# Altium PCB Grantv3.PcbDoc (part 2 of 5)
Units mil, origin at the board's own origin, x right, y up, seen from the top; angles counter-clockwise.
Board outline 3031.03 x 2829.03 mil, 2 copper layers (Top Layer, Bottom Layer); 187 components, 111 nets, 634 pads, 178 vias.
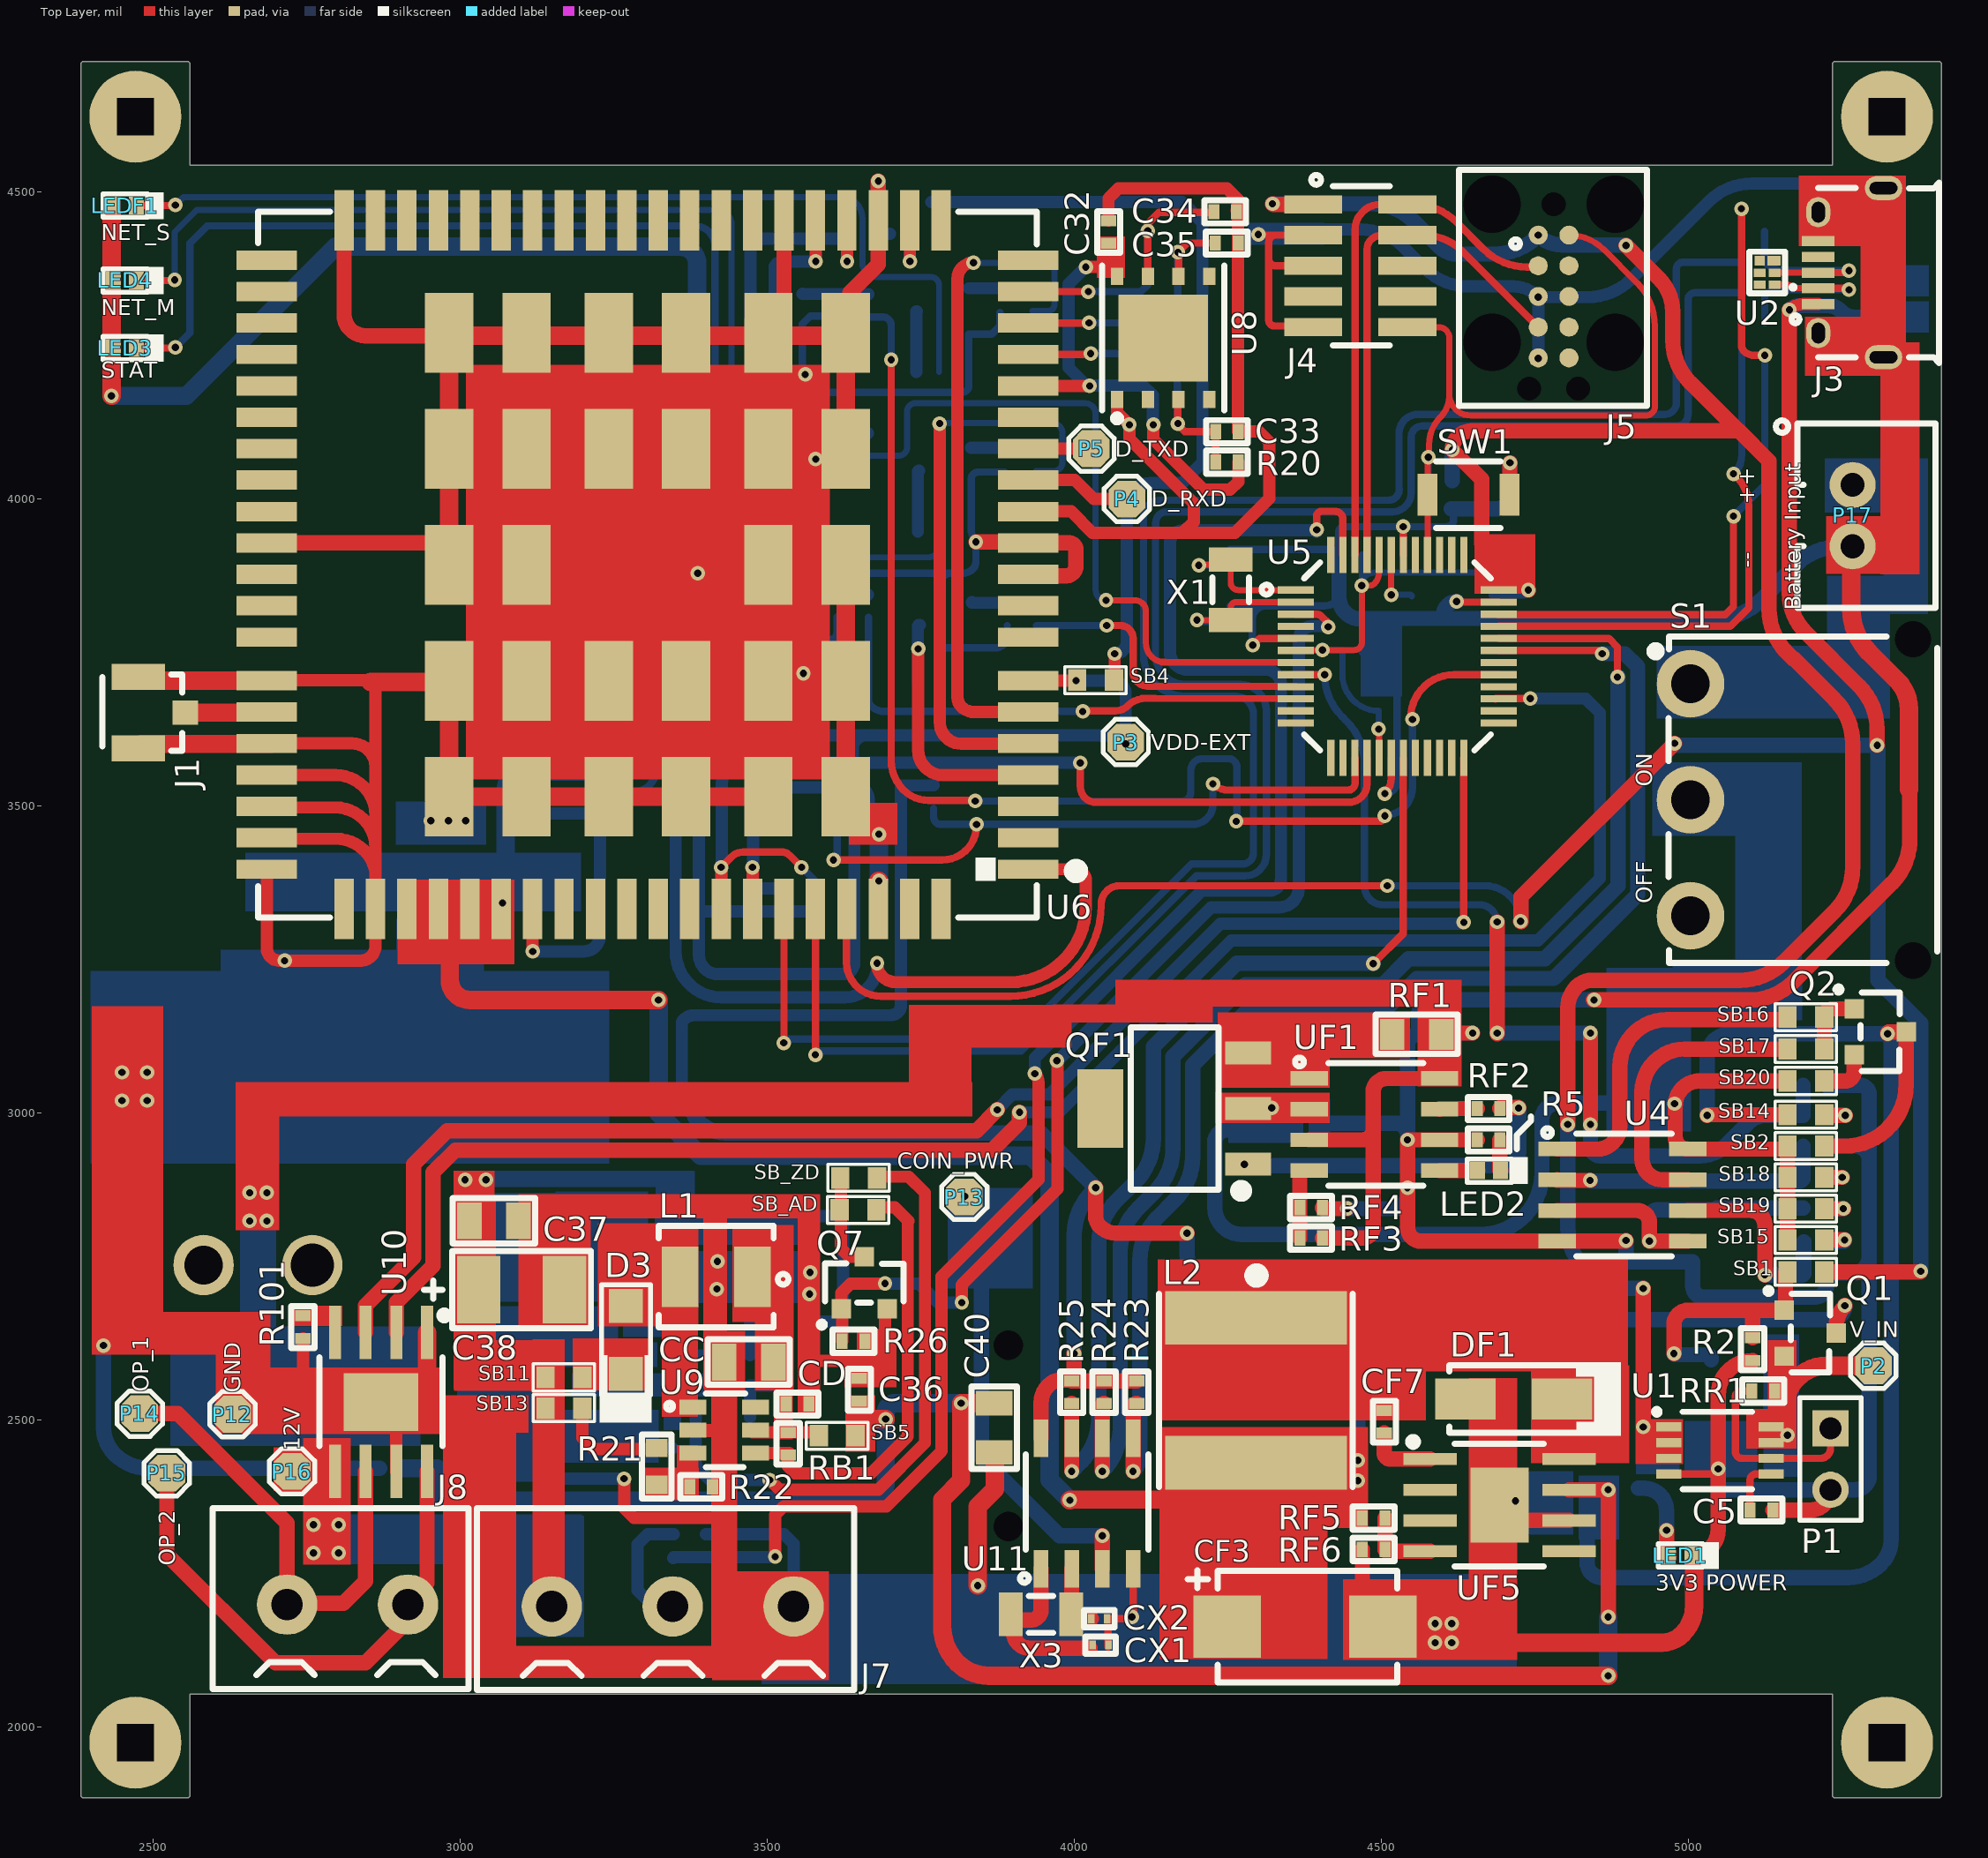
[diagram p0: Top Layer view]

## Part data (continued)
J5: "CBL PLUG-OF-NAILS 10-PIN W/LEGS", MANUFACTURER=Tag-Connect, Package Quantity=1, Supplier Part Number 1=TC2050-IDC-ND, ComponentLink1Description=http://www.tag-connect.com/Materials/TC2050-IDC%20Datasheet.pdf?src-supplier=Digi-Key, ComponentLink1URL=http://www.tag-connect.com/Materials/TC2050-IDC%20Datasheet.pdf?src-supplier=Digi-Key, Manufacturer Part Number=TC2050-IDC, Pricing 1="1=40.17 (USD)", Stock 1=59, Supplier 1=Digi-Key
J6: "SMD Battery Holders, Clips & Contacts RoHS", MANUFACTURER=Q&J, Package=Cuctom, Manufacturer Part No=CR1220-2
J7 J8: "P=5.0mm Screw terminal RoHS", MANUFACTURER="Ningbo Kangnex Elec", Package=Custom
  J7: Manufacturer Part No=WJ301V-5.0-3P
  J8: Manufacturer Part No=WJ301V-5.0-2P
L1 LZ: "10uH ±20% 1.6A 230mO SMD,4.75x4.2x2mm Inductors (SMD) RoHS", MANUFACTURER=COILMX, Package=Custom, Manufacturer Part No=MS0420-100M
L2: "15uH ±20% 2.5A 56mO SMD,8.0x8.0mm Inductors (SMD) RoHS", MANUFACTURER="3L COILS", Package=Custom, Manufacturer Part No=SNR8040K-150M
LED1 LED2: "Red 625nm 0402 Light Emitting Diodes (LED) RoHS", MANUFACTURER=TOGIALED, Package=0402, Manufacturer Part No=TJ-S1005SW4TGLC2R-A5
LED3: "Blue 465nm 0402 Light Emitting Diodes (LED) RoHS", MANUFACTURER=TOGIALED, Package=0402, Manufacturer Part No=TJ-S1005SW4TGLC6B-A5
LED4 LEDF1: "Green 573nm 0402 Light Emitting Diodes (LED) RoHS", MANUFACTURER=TOGIALED, Package=0402, Manufacturer Part No=TJ-S1005SW4TGLC7K-A5
P1: library part "Header 1x2", "CONN HEADER VERT 2POS 2.54MM", Color=Black, Current Rating=3A, MANUFACTURER="Wurth Electronics", Max Operating Temperature=125°C, Min Operating Temperature=-40°C, Supplier Part Number 1=732-5315-ND, Voltage Rating=250V, ComponentLink1Description=http://www.mouser.com/ds/2/445/6130xx11121-538006.pdf?src-supplier=Mouser, ComponentLink1URL=http://www.mouser.com/ds/2/445/6130xx11121-538006.pdf?src-supplier=Mouser, Connector Type="Male Pin", Contact Gender=Male, Contact Material="Copper Alloy,Copper", Contact Mating Length=0.236inch, Contact Plating=Gold, Gender=Male, Housing Material=PBT, Lead Free="Lead Free", Manufacturer Part Number=61300211121, Mount="Through Hole", Number of Contacts=2, Number of Positions=2, Number of Rows=1, Packaging=Bulk, Pitch=0.1inch, Pricing 1="1=0.13, 10=0.106, 25=0.088, 50=0.074, 100=0.067, 1000=0.061 (USD)", REACH SVHC=Unknown, Stock 1=219205, Supplier 1=Digi-Key, Termination="Through Hole"
P2: "Test Point ON"
P3 P4 P5 P12 P13 P14 P15 P16: library part "TEST POINT", "Test Point ON"
P17: library part "2 Pin JST Connector", "2 PIN JST Connector"
Q1: "MOSFET P-CHAN 24V SOT23", Case/Package=SOT-23, Continuous Drain Current (ID)=4.3A, Drain to Source Voltage (Vdss)=20V, Input Capacitance=634pF, MANUFACTURER=Diodes, Max Operating Temperature=150°C, Max Power Dissipation=800mW, Min Operating Temperature=-55°C, Supplier Part Number 1=DMP2045U-7DICT-ND, ComponentLink1Description=https://www.diodes.com/assets/Datasheets/DMP2045U.pdf?src-supplier=Digi-Key, ComponentLink1URL=https://www.diodes.com/assets/Datasheets/DMP2045U.pdf?src-supplier=Digi-Key, Manufacturer Part Number=DMP2045U-7, Mount="Surface Mount", Packaging="Tape and Reel", Pricing 1="1=0.43, 10=0.323, 25=0.2828, 100=0.1535, 250=0.15272, 500=0.12524, 1000=0.09292 (USD)", Rds On Max=45mR, Stock 1=21481, Supplier 1=Digi-Key
Q2: "MOSFET P-CH 20V 2.8A SOT-23", MANUFACTURER=Nexperia, Supplier Part Number 1=1727-3124-1-ND, Manufacturer Part Number=PMV65XP,215, Pricing 1="1=0.38, 10=0.28, 25=0.2452, 100=0.133, 250=0.13232, 500=0.1085, 1000=0.0805 (USD)", Stock 1=60287, Supplier 1=Digi-Key
Q4 Q5 Q6 QF3 QF4 QF7: "MOSFET N-CH 50V 200MA SOT-23", Case/Package=SOT-23-3, Continuous Drain Current (ID)=200mA, Drain to Source Breakdown Voltage=50V, Drain to Source Resistance=3.5R, Gate to Source Voltage (Vgs)=20V, Input Capacitance=50pF, MANUFACTURER="ON Semiconductor", Max Operating Temperature=150°C, Max Power Dissipation=225mW, Min Operating Temperature=-55°C, Package Quantity=1, Supplier Part Number 1=BSS138LT1GOSDKR-ND, Threshold Voltage=1.5V, ComponentLink1Description=https://datasheet.ciiva.com/22641/1596366-22641636.pdf, ComponentLink1URL=https://datasheet.ciiva.com/22641/1596366-22641636.pdf, ComponentLink2Description=https://datasheet.ciiva.com/1190/1596366-1190137.pdf, ComponentLink2URL=https://datasheet.ciiva.com/1190/1596366-1190137.pdf, ComponentLink3Description=https://datasheet.ciiva.com/15198/getdatasheetpartid-110266-15198908.pdf, ComponentLink3URL=https://datasheet.ciiva.com/15198/getdatasheetpartid-110266-15198908.pdf, ComponentLink4Description=https://datasheet.ciiva.com/8115/bss138lt1-d-8115295.pdf, ComponentLink4URL=https://datasheet.ciiva.com/8115/bss138lt1-d-8115295.pdf, ComponentLink5Description=https://datasheet.ciiva.com/8115/bss138lt1-d-8115358.pdf, ComponentLink5URL=https://datasheet.ciiva.com/8115/bss138lt1-d-8115358.pdf, ComponentLink6Description=https://datasheet.ciiva.com/1190/1596366-1190136.pdf, ComponentLink6URL=https://datasheet.ciiva.com/1190/1596366-1190136.pdf, ComponentLink7Description=https://datasheet.ciiva.com/936/bss138lt1-d-936802.pdf, ComponentLink7URL=https://datasheet.ciiva.com/936/bss138lt1-d-936802.pdf, ComponentLink8Description=https://datasheet.ciiva.com/936/bss138lt1-d-936801.pdf, ComponentLink8URL=https://datasheet.ciiva.com/936/bss138lt1-d-936801.pdf, ComponentLink9Description=https://datasheet.ciiva.com/14553/70099493-14553829.pdf, ComponentLink9URL=https://datasheet.ciiva.com/14553/70099493-14553829.pdf, ComponentLink10Description=https://datasheet.ciiva.com/936/bss138lt1-d-936803.pdf, ComponentLink10URL=https://datasheet.ciiva.com/936/bss138lt1-d-936803.pdf, ComponentLink11Description=http://www.onsemi.com/pub/Collateral/BSS138LT1-D.PDF?src-supplier=Digi-Key, ComponentLink11URL=http://www.onsemi.com/pub/Collateral/BSS138LT1-D.PDF?src-supplier=Digi-Key, ComponentLink12Description=http://www.farnell.com/datasheets/1596366.pdf?src-supplier=Element14, ComponentLink12URL=http://www.farnell.com/datasheets/1596366.pdf?src-supplier=Element14, ComponentLink13Description=http://www.alliedelec.com/m/d/b3c6fd7d92596813fe75d33dcbaaae90.pdf?src-supplier=Allied+Electronics, ComponentLink13URL=http://www.alliedelec.com/m/d/b3c6fd7d92596813fe75d33dcbaaae90.pdf?src-supplier=Allied+Electronics, ComponentLink14Description=https://www.verical.com/server-webapp/html/getDatasheet?partID=110266&src-supplier=Verical, ComponentLink14URL=https://www.verical.com/server-webapp/html/getDatasheet?partID=110266&src-supplier=Verical, ComponentLink15Description=http://www.onsemi.com/pub_link/Collateral/BSS138LT1-D.PDF?src-supplier=Avnet, ComponentLink15URL=http://www.onsemi.com/pub_link/Collateral/BSS138LT1-D.PDF?src-supplier=Avnet, Contact Plating=Tin,Matte, Current Rating=200mA, Element Configuration=Single, Halogen Free="Halogen Free", Height=1.01mm, Lead Free="Lead Free", Length=3.04mm, Manufacturer Part Number=BSS138LT1G, Nominal Vgs=1.5V, Number of Elements=1, Number of Pins=3, On-State Resistance=3.5R, Packaging="Tape and Reel", Power Dissipation=225mW, Pricing 1="1=0.27, 10=0.222, 100=0.1177, 500=0.07746, 1000=0.05267 (USD)", Radiation Hardening=No, Rds On Max=3.5R, REACH SVHC="No SVHC", Stock 1=1283212, Supplier 1=Digi-Key, Turn-Off Delay Time=20ns, Turn-On Delay Time=20ns, Voltage Rating (DC)=50V, Width=1.4mm
Q7: "MOSFET N-CH 100V .1A SOT23-3", Case/Package=SOT-23, Continuous Drain Current (ID)=100mA, Drain to Source Breakdown Voltage=100V, Drain to Source Resistance=10R, Gate to Source Voltage (Vgs)=20V, Input Capacitance=40pF, MANUFACTURER="Diodes Zetex", Max Operating Temperature=150°C, Max Power Dissipation=330mW, Min Operating Temperature=-55°C, Package Quantity=3000, Supplier Part Number 1=ZVN3310FCT-ND, Threshold Voltage=2.4V, ComponentLink1Description=http://www.diodes.com/_files/datasheets/ZVN3310F.pdf?src-supplier=Digi-Key, ComponentLink1URL=http://www.diodes.com/_files/datasheets/ZVN3310F.pdf?src-supplier=Digi-Key, Current=100mA, Current Rating=100mA, Drain to Source Voltage (Vdss)=100V, Dual Supply Voltage=100V, Element Configuration=Single, Fall Time=5ns, Height=1.02mm, Lead Free="Lead Free", Length=3.04mm, Manufacturer Part Number=ZVN3310FTA, Mount="Surface Mount", Nominal Vgs=2.4V, Number of Channels=1, Number of Elements=1, Number of Pins=3, On-State Resistance=10R, Packaging="Tape and Reel", Power Dissipation=330mW, Pricing 1="1=0.59, 10=0.517, 25=0.4852, 100=0.3522, 250=0.33972, 500=0.29432, 1000=0.25048 (USD)", Radiation Hardening=No, Rds On Max=10R, REACH SVHC="No SVHC", Rise Time=5ns, Stock 1=16974, Supplier 1=Digi-Key, Termination=SMD/SMT, Turn-Off Delay Time=4ns, Turn-On Delay Time=3ns, Voltage=100V, Voltage Rating (DC)=100V, Weight=0.000282oz, Width=1.4mm
Q8: "MOSFET 2N-CH 60V 0.32A 6TSSOP", MANUFACTURER=Nexperia, Supplier Part Number 1=1727-6479-1-ND, ComponentLink1Description=http://www.farnell.com/datasheets/1443348.pdf?src-supplier=Farnell, ComponentLink1URL=http://www.farnell.com/datasheets/1443348.pdf?src-supplier=Farnell, ComponentLink2Description=https://assets.nexperia.com/documents/data-sheet/BSS138PS.pdf?src-supplier=Digi-Key, ComponentLink2URL=https://assets.nexperia.com/documents/data-sheet/BSS138PS.pdf?src-supplier=Digi-Key, ComponentLink3Description=http://www.farnell.com/datasheets/1443348.pdf?src-supplier=Newark, ComponentLink3URL=http://www.farnell.com/datasheets/1443348.pdf?src-supplier=Newark, Manufacturer Part Number=BSS138PS,115, Pricing 1="1=0.42, 10=0.31, 25=0.2716, 100=0.1474, 250=0.14668, 500=0.12028, 1000=0.08924 (USD)", Stock 1=143402, Supplier 1=Digi-Key
QF1: "TRANS PNP 60V 3A SOT223", Case/Package=SOT-223, Collector Base Voltage (VCBO)=-60V, Collector Emitter Breakdown Voltage=60V, Collector Emitter Saturation Voltage=500mV, Current Rating=-3A, Emitter Base Voltage (VEBO)=-5V, Frequency=75MHz, MANUFACTURER="ON Semiconductor / Fairchild", Max Collector Current=3A, Max Operating Temperature=150°C, Max Power Dissipation=2W, Min Operating Temperature=-55°C, Package Quantity=1, Supplier Part Number 1=NZT660ACT-ND, Collector Emitter Voltage (VCEO)=60V, ComponentLink1Description=http://www.mouser.com/ds/2/149/NZT660A-191298.pdf?src-supplier=Mouser, ComponentLink1URL=http://www.mouser.com/ds/2/149/NZT660A-191298.pdf?src-supplier=Mouser, ComponentLink2Description=http://www.fairchildsemi.com/datasheets/NZ/NZT660A.pdf?src-supplier=Digi-Key, ComponentLink2URL=http://www.fairchildsemi.com/datasheets/NZ/NZT660A.pdf?src-supplier=Digi-Key, ComponentLink3Description=https://www.fairchildsemi.com/package-drawings/MA/MA04A.pdf?src-supplier=Digi-Key, ComponentLink3URL=https://www.fairchildsemi.com/package-drawings/MA/MA04A.pdf?src-supplier=Digi-Key, ComponentLink4Description=https://www.fairchildsemi.com/datasheets/NZ/NZT660.pdf?src-supplier=Avnet, ComponentLink4URL=https://www.fairchildsemi.com/datasheets/NZ/NZT660.pdf?src-supplier=Avnet, ComponentLink5Description=http://www.fairchildsemi.com/ds/NZ/NZT660.pdf?src-supplier=Avnet, ComponentLink5URL=http://www.fairchildsemi.com/ds/NZ/NZT660.pdf?src-supplier=Avnet, ComponentLink6Description=http://www.farnell.com/datasheets/1794589.pdf?src-supplier=Element14, ComponentLink6URL=http://www.farnell.com/datasheets/1794589.pdf?src-supplier=Element14, ComponentLink7Description=http://www.fairchildsemi.com/ds/NZ/NZT660A.pdf?src-supplier=Future+Electronics, ComponentLink7URL=http://www.fairchildsemi.com/ds/NZ/NZT660A.pdf?src-supplier=Future+Electronics, Element Configuration=Single, Gain Bandwidth Product=75MHz, hFE Min=250, Lead Free="Lead Free", Manufacturer Part Number=NZT660A, Max Breakdown Voltage=60V, Mount="Surface Mount", Number of Elements=1, Number of Pins=4, Packaging="Tape and Reel", Polarity=PNP, Power Dissipation=2W, Pricing 1="1=0.48, 10=0.411, 25=0.3832, 100=0.2847, 250=0.27048, 500=0.22228, 1000=0.18068 (USD)", Radiation Hardening=No, REACH SVHC="No SVHC", Stock 1=9382, Supplier 1=Digi-Key, Transition Frequency=75MHz, Voltage Rating (DC)=-60V, Weight=0.188g
R1: library part RTT02471JTH, "470 ±5% 1/16W ±100ppm/°C 0402 Chip Resistor - Surface Mount RoHS", MANUFACTURER=RALEC, Package=0402, Manufacturer Part No=RTT02471JTH
R2: library part ERJPA2F1003X, "RES SMD 100K OHM 1% 1/5W 0402", Case/Package=0402, Case Code (Metric)=1005, MANUFACTURER=Panasonic, Manufacturer Part Number=ERJ-PA2F1003X, Max Operating Temperature=155°C, Max Power Dissipation=200mW, Min Operating Temperature=-55°C, Resistance=100kR, Supplier Part Number 1=P17236CT-ND, Temperature Coefficient=100ppm/°C, Tolerance=1%, Voltage Rating=50V, Case Code (Imperial)=0402, ComponentLink1Description=http://www.farnell.com/datasheets/2051174.pdf?src-supplier=Element14, ComponentLink1URL=http://www.farnell.com/datasheets/2051174.pdf?src-supplier=Element14, ComponentLink2Description=https://industrial.panasonic.com/ww/system/files/data/download/catalog/id_fixed-resistors_e_1.pdf?src-supplier=Digi-Key, ComponentLink2URL=https://industrial.panasonic.com/ww/system/files/data/download/catalog/id_fixed-resistors_e_1.pdf?src-supplier=Digi-Key, Composition="Thick Film", Features="Automotive AEC-Q200", Height=0.016inch, Length=0.039inch, Number of Terminations=2, Packaging="Cut Tape", Power Rating=200mW, Pricing 1="1=0.21, 10=0.175, 100=0.0686, 1000=0.02871, 2500=0.02632, 5000=0.02393 (USD)", REACH SVHC=Unknown, Stock 1=8829, Supplier 1=Digi-Key, Voltage Rating (DC)=50V, Width=0.02inch
R5: library part RC0402FR-072KL, "RES SMD 2K OHM 1% 1/16W 0402", Case/Package=0402, Case Code (Metric)=1005, MANUFACTURER=Yageo, Max Operating Temperature=155°C, Max Power Dissipation=63mW, Min Operating Temperature=-55°C, Package Quantity=1, Resistance=2kR, Supplier Part Number 1=311-2KLRCT-ND, Temperature Coefficient=100ppm/°C, Tolerance=1%, Voltage Rating=50V, Case Code (Imperial)=0402, ComponentLink1Description=http://www.yageo.com/documents/recent/PYu-RC_Group_51_RoHS_L_10.pdf?src-supplier=Digi-Key, ComponentLink1URL=http://www.yageo.com/documents/recent/PYu-RC_Group_51_RoHS_L_10.pdf?src-supplier=Digi-Key, ComponentLink2Description=http://documents.rs-components.com/techlib://itc_doclist_GB.htm?stockno=6186510&src-supplier=RSComponents, ComponentLink2URL=http://documents.rs-components.com/techlib://itc_doclist_GB.htm?stockno=6186510&src-supplier=RSComponents, ComponentLink3Description=https://www.verical.com/server-webapp/html/getDatasheet?partID=358921&src-supplier=Verical, ComponentLink3URL=https://www.verical.com/server-webapp/html/getDatasheet?partID=358921&src-supplier=Verical, ComponentLink4Description=http://www.mouser.com/ds/2/447/PYu-RC0402_51_RoHS_L_6_r-8721.pdf?src-supplier=Mouser, ComponentLink4URL=http://www.mouser.com/ds/2/447/PYu-RC0402_51_RoHS_L_6_r-8721.pdf?src-supplier=Mouser, ComponentLink5Description=http://www.farnell.com/datasheets/1018594.pdf?src-supplier=Element14, ComponentLink5URL=http://www.farnell.com/datasheets/1018594.pdf?src-supplier=Element14, ComponentLink6Description=http://www.farnell.com/datasheets/2167052.pdf?src-supplier=Element14, ComponentLink6URL=http://www.farnell.com/datasheets/2167052.pdf?src-supplier=Element14, Composition="Thick Film", Depth=0.5mm, Features="Moisture Resistant", Height=0.016inch, Lead Free="Lead Free", Length=1mm, Manufacturer Part Number=RC0402FR-072KL, Military Standard=Not, Number of Terminations=2, Packaging="Tape and Reel", Power Rating=63mW, Pricing 1="1=0.1, 10=0.016, 100=0.0064, 1000=0.00289, 2500=0.00251, 5000=0.00207 (USD)", REACH SVHC=Unknown, Stock 1=4877389, Supplier 1=Digi-Key, Termination=SMD/SMT, Voltage Rating (DC)=50V, Width=0.02inch, Working Voltage=50V
R6: library part AC0402FR-0780K6L, "RES SMD 80.6K OHM 1% 1/16W 0402", Case/Package=0402, MANUFACTURER=Yageo, Max Operating Temperature=155°C, Max Power Dissipation=63mW, Min Operating Temperature=-55°C, Resistance=80.6kR, Supplier Part Number 1=YAG5310CT-ND, Temperature Coefficient=100ppm/°C, Tolerance=1%, ComponentLink1Description=http://www.yageo.com/NewPortal/yageodocoutput?fileName=/pdf/R-Chip/PYu-AC_51_RoHS_L_5.pdf&src-supplier=Digi-Key, ComponentLink1URL=http://www.yageo.com/NewPortal/yageodocoutput?fileName=/pdf/R-Chip/PYu-AC_51_RoHS_L_5.pdf&src-supplier=Digi-Key, ComponentLink2Description=http://www.yageo.com/NewPortal/yageodocoutput?fileName=/pdf/R-Chip/PYu-AC_51_RoHS_L_6.pdf&src-supplier=Digi-Key, ComponentLink2URL=http://www.yageo.com/NewPortal/yageodocoutput?fileName=/pdf/R-Chip/PYu-AC_51_RoHS_L_6.pdf&src-supplier=Digi-Key, Composition="Thick Film", Features="Moisture Resistant,Automotive AEC-Q200", Height=0.015inch, Length=0.039inch, Manufacturer Part Number=AC0402FR-0780K6L, Number of Terminations=2, Packaging="Tape and Reel", Pricing 1="1=0.1, 10=0.021, 100=0.0087, 1000=0.0039, 2500=0.00338, 5000=0.00279 (USD)", Stock 1=34085, Supplier 1=Digi-Key, Width=0.02inch
R7: library part AC0402FR-0730K9L, "RES SMD 30.9K OHM 1% 1/16W 0402", Case/Package=0402, Case Code (Metric)=1005, MANUFACTURER=Yageo, Max Operating Temperature=155°C, Max Power Dissipation=63mW, Min Operating Temperature=-55°C, Power Rating=62.5mW, Resistance=30.9kR, Supplier Part Number 1=AC0402FR-0730K9L-ND, Temperature Coefficient=100ppm/°C, Tolerance=1%, Voltage Rating=50V, Case Code (Imperial)=0402, ComponentLink1Description=http://www.mouser.com/ds/2/447/yageodocoutput-1111992.pdf?src-supplier=Mouser, ComponentLink1URL=http://www.mouser.com/ds/2/447/yageodocoutput-1111992.pdf?src-supplier=Mouser, ComponentLink2Description=http://www.yageo.com/NewPortal/yageodocoutput?fileName=/pdf/R-Chip/PYu-AC_51_RoHS_L_6.pdf&src-supplier=Digi-Key, ComponentLink2URL=http://www.yageo.com/NewPortal/yageodocoutput?fileName=/pdf/R-Chip/PYu-AC_51_RoHS_L_6.pdf&src-supplier=Digi-Key, Composition="Thick Film", Features="Moisture Resistant,Automotive AEC-Q200", Height=0.015inch, Length=0.039inch, Manufacturer Part Number=AC0402FR-0730K9L, Number of Terminations=2, Packaging="Tape and Reel", Pricing 1="10000=0.0022 (USD)", Stock 1=0, Supplier 1=Digi-Key, Termination=SMD/SMT, Weight=2.3E-05oz, Width=0.5mm
R8 R9 RP2: library part RC0402JR-0720KL, "RES SMD 20K OHM 5% 1/16W 0402", Case/Package=0402, Case Code (Metric)=1005, MANUFACTURER=Yageo, Max Operating Temperature=155°C, Max Power Dissipation=63mW, Min Operating Temperature=-55°C, Package Quantity=1, Power Rating=62.5mW, Resistance=20kR, Supplier Part Number 1=311-20KJRCT-ND, Temperature Coefficient=100ppm/°C, Tolerance=5%, Voltage Rating=50V, Case Code (Imperial)=0402, ComponentLink1Description=http://www.yageo.com/documents/recent/PYu-RC_Group_51_RoHS_L_9.pdf?src-supplier=Digi-Key, ComponentLink1URL=http://www.yageo.com/documents/recent/PYu-RC_Group_51_RoHS_L_9.pdf?src-supplier=Digi-Key, ComponentLink2Description=http://www.farnell.com/datasheets/1018594.pdf?src-supplier=Element14, ComponentLink2URL=http://www.farnell.com/datasheets/1018594.pdf?src-supplier=Element14, ComponentLink3Description=http://www.mouser.com/ds/2/447/PYu-RC0402_51_RoHS_L_6_r-8721.pdf?src-supplier=Mouser, ComponentLink3URL=http://www.mouser.com/ds/2/447/PYu-RC0402_51_RoHS_L_6_r-8721.pdf?src-supplier=Mouser, ComponentLink4Description=http://www.yageo.com/documents/recent/PYu-RC0402_51_RoHS_L_6_r.pdf?src-supplier=Future+Electronics, ComponentLink4URL=http://www.yageo.com/documents/recent/PYu-RC0402_51_RoHS_L_6_r.pdf?src-supplier=Future+Electronics, Composition="Thick Film", Depth=0.5mm, Features="Moisture Resistant", Height=0.016inch, Lead Free="Lead Free", Length=0.039inch, Manufacturer Part Number=RC0402JR-0720KL, Military Standard=Not, Number of Pins=2, Number of Terminations=2, Packaging="Tape and Reel", Pricing 1="1=0.1, 10=0.013, 100=0.0053, 1000=0.00236, 2500=0.00205, 5000=0.00169 (USD)", REACH SVHC="No SVHC", Stock 1=4817510, Supplier 1=Digi-Key, Termination=SMD/SMT, Voltage Rating (DC)=50V, Width=0.02inch
R10 R11 R31: library part RC0402FR-072K2L, "RES SMD 2.2K OHM 1% 1/16W 0402", Case/Package=0402, Case Code (Metric)=1005, MANUFACTURER=Yageo, Max Operating Temperature=155°C, Min Operating Temperature=-55°C, Power Rating=63mW, Resistance=2.2kR, Supplier Part Number 1=311-2.20KLRDKR-ND, Temperature Coefficient=100ppm/°C, Tolerance=1%, Voltage Rating=50V, Case Code (Imperial)=0402, ComponentLink1Description=http://documents.rs-components.com/techlib://itc_doclist_GB.htm?stockno=6186532&src-supplier=RSComponents, ComponentLink1URL=http://documents.rs-components.com/techlib://itc_doclist_GB.htm?stockno=6186532&src-supplier=RSComponents, ComponentLink2Description=http://www.yageo.com/documents/recent/PYu-RC_Group_51_RoHS_L_9.pdf?src-supplier=Mouser, ComponentLink2URL=http://www.yageo.com/documents/recent/PYu-RC_Group_51_RoHS_L_9.pdf?src-supplier=Mouser, ComponentLink3Description=http://www.yageo.com/documents/recent/PYu-RC0402_51_RoHS_L_6_r.pdf?src-supplier=Future+Electronics, ComponentLink3URL=http://www.yageo.com/documents/recent/PYu-RC0402_51_RoHS_L_6_r.pdf?src-supplier=Future+Electronics, ComponentLink4Description=http://www.farnell.com/datasheets/2167052.pdf?src-supplier=Element14, ComponentLink4URL=http://www.farnell.com/datasheets/2167052.pdf?src-supplier=Element14, Composition="Thick Film", Depth=0.5mm, Height=0.35mm, Lead Free="Lead Free", Length=1mm, Manufacturer Part Number=RC0402FR-072K2L, Military Standard=Not, Packaging="Tape and Reel", Pricing 1="1=0.1, 10=0.016, 100=0.0064, 1000=0.00289, 2500=0.00251, 5000=0.00207 (USD)", REACH SVHC=Unknown, Stock 1=0, Supplier 1=Digi-Key, Termination=SMD/SMT, Weight=2.3E-05oz, Width=0.5mm
R12 R13 R14 R18 RF6 RF7 RF10 RF13: library part CR0402JF0472G, "4.7K ±5% 1/16W ±200ppm/°C 0402 Chip Resistor - Surface Mount RoHS", MANUFACTURER="LIZ Elec", Package=0402, Manufacturer Part No=CR0402JF0472G
R16 R17 R19 RB1 RF8 RF11 RF14 RZ: library part RC0402FR-0747KL, "RES SMD 47K OHM 1% 1/16W 0402", Case/Package=0402, Case Code (Metric)=1005, MANUFACTURER=Yageo, Max Operating Temperature=155°C, Max Power Dissipation=63mW, Min Operating Temperature=-55°C, Package Quantity=1, Power Rating=62.5mW, Resistance=47kR, Supplier Part Number 1=311-47.0KLRDKR-ND, Temperature Coefficient=100ppm/°C, Tolerance=1%, Voltage Rating=50V, Case Code (Imperial)=0402, ComponentLink1Description=http://www.yageo.com/documents/recent/PYu-RC0402_51_RoHS_L_6_r.pdf?src-supplier=Future+Electronics, ComponentLink1URL=http://www.yageo.com/documents/recent/PYu-RC0402_51_RoHS_L_6_r.pdf?src-supplier=Future+Electronics, ComponentLink2Description=http://www.farnell.com/datasheets/1018594.pdf?src-supplier=Element14, ComponentLink2URL=http://www.farnell.com/datasheets/1018594.pdf?src-supplier=Element14, ComponentLink3Description=https://www.verical.com/server-webapp/html/getDatasheet?partID=323748&src-supplier=Verical, ComponentLink3URL=https://www.verical.com/server-webapp/html/getDatasheet?partID=323748&src-supplier=Verical, ComponentLink4Description=http://www.yageo.com/documents/recent/PYu-RC_Group_51_RoHS_L_10.pdf?src-supplier=Digi-Key, ComponentLink4URL=http://www.yageo.com/documents/recent/PYu-RC_Group_51_RoHS_L_10.pdf?src-supplier=Digi-Key, Composition="Thick Film", Depth=0.5mm, Features="Moisture Resistant", Height=0.016inch, Lead Free="Lead Free", Length=1mm, Manufacturer Part Number=RC0402FR-0747KL, Military Standard=Not, Number of Terminations=2, Packaging="Tape and Reel", Pricing 1="1=0.1, 10=0.016, 100=0.0064, 1000=0.00289, 2500=0.00251, 5000=0.00207 (USD)", REACH SVHC=Unknown, Stock 1=0, Supplier 1=Digi-Key, Termination=SMD/SMT, Width=0.5mm
R20: library part RMC10-153JTH, "15K ±5% 1/10W ±200ppm/? 0402 Chip Resistor - Surface Mount RoHS", MANUFACTURER=KAMAYA, Package=0402, Manufacturer Part No=RMC10-153JTH
R21: library part AC0603FR-071M4L, "Thick Film Resistors - SMD", MANUFACTURER=Yageo, Supplier Part Number 1=603-AC0603FR-071M4L, Manufacturer Part Number=AC0603FR-071M4L, Pricing 1="1=0.1, 10=0.021, 100=0.007, 1000=0.005, 2500=0.003, 10000=0.003 (USD)", Stock 1=0, Supplier 1=Mouser
R22: library part AC0402FR-0771K5L, "RES SMD 71.5K OHM 1% 1/16W 0402", Case/Package=0402, MANUFACTURER=Yageo, Max Operating Temperature=155°C, Max Power Dissipation=63mW, Min Operating Temperature=-55°C, Resistance=71.5kR, Supplier Part Number 1=AC0402FR-0771K5L-ND, Temperature Coefficient=100ppm/°C, Tolerance=1%, ComponentLink1Description=http://www.yageo.com/NewPortal/yageodocoutput?fileName=/pdf/R-Chip/PYu-AC_51_RoHS_L_6.pdf&src-supplier=Digi-Key, ComponentLink1URL=http://www.yageo.com/NewPortal/yageodocoutput?fileName=/pdf/R-Chip/PYu-AC_51_RoHS_L_6.pdf&src-supplier=Digi-Key, Composition="Thick Film", Features="Moisture Resistant,Automotive AEC-Q200", Height=0.015inch, Length=0.039inch, Manufacturer Part Number=AC0402FR-0771K5L, Number of Terminations=2, Packaging="Tape and Reel", Pricing 1="10000=0.0022 (USD)", Stock 1=0, Supplier 1=Digi-Key, Width=0.02inch
R23 R24 R25 R26 RF5 RR1 RS1 RS2 RS3 RS4: library part RK73B1ETTP103J, "RES 10K OHM 5% 1/10W 0402", Case/Package=0402, Case Code (Metric)=1005, MANUFACTURER="KOA Speer", Max Operating Temperature=155°C, Min Operating Temperature=-55°C, Package Quantity=10000, Power Rating=63mW, Resistance=10kR, Supplier Part Number 1=2019-RK73B1ETTP103JCT-ND, Temperature Coefficient=200ppm/°C, Tolerance=5%, Voltage Rating=50V, Case Code (Imperial)=0402, ComponentLink1Description=https://www.verical.com/server-webapp/html/getDatasheet?partID=89073&src-supplier=Verical, ComponentLink1URL=https://www.verical.com/server-webapp/html/getDatasheet?partID=89073&src-supplier=Verical, Composition="Thick Film", Depth=0.5mm, Height=0.35mm, Lead Free="Lead Free", Length=1mm, Manufacturer Part Number=RK73B1ETTP103J, Military Standard=Not, Mount="Surface Mount", Packaging="Tape and Reel", Pricing 1="1=0.1, 10=0.016, 100=0.0065, 1000=0.00292, 2500=0.00253, 5000=0.00209 (USD)", Stock 1=2917894, Supplier 1=Digi-Key, Termination=SMD/SMT, Voltage Rating (DC)=50V, Width=0.5mm
R27: library part RC0402FR-07133KL, "RES SMD 133K OHM 1% 1/16W 0402", Case/Package=0402, Case Code (Metric)=1005, MANUFACTURER=Yageo, Max Operating Temperature=155°C, Max Power Dissipation=63mW, Min Operating Temperature=-55°C, Power Rating=62.5mW, Resistance=133kR, Supplier Part Number 1=YAG2970CT-ND, Temperature Coefficient=100ppm/°C, Tolerance=1%, Voltage Rating=50V, Case Code (Imperial)=0402, ComponentLink1Description=http://www.yageo.com/documents/recent/PYu-RC_Group_51_RoHS_L_10.pdf?src-supplier=Digi-Key, ComponentLink1URL=http://www.yageo.com/documents/recent/PYu-RC_Group_51_RoHS_L_10.pdf?src-supplier=Digi-Key, ComponentLink2Description=http://www.yageo.com/documents/recent/PYu-RC_Group_51_RoHS_L_9.pdf?src-supplier=Digi-Key, ComponentLink2URL=http://www.yageo.com/documents/recent/PYu-RC_Group_51_RoHS_L_9.pdf?src-supplier=Digi-Key, ComponentLink3Description=http://www.mouser.com/catalog/specsheets/RC0603.pdf?src-supplier=Mouser, ComponentLink3URL=http://www.mouser.com/catalog/specsheets/RC0603.pdf?src-supplier=Mouser, ComponentLink4Description=http://www.yageo.com/documents/recent/PYu-RC_Group_51_RoHS_L_8.pdf?src-supplier=Future+Electronics, ComponentLink4URL=http://www.yageo.com/documents/recent/PYu-RC_Group_51_RoHS_L_8.pdf?src-supplier=Future+Electronics, ComponentLink5Description=http://www.yageo.com/documents/recent/PYu-RC0402_51_RoHS_L_6.pdf?src-supplier=Avnet, ComponentLink5URL=http://www.yageo.com/documents/recent/PYu-RC0402_51_RoHS_L_6.pdf?src-supplier=Avnet, Composition="Thick Film", Contact Plating=Tin,Matte, Depth=0.5mm, Features="Moisture Resistant", Height=0.016inch, Lead Free="Lead Free", Length=1mm, Manufacturer Part Number=RC0402FR-07133KL, Military Standard=Not, Number of Terminations=2, Packaging="Tape and Reel", Pricing 1="1=0.1, 10=0.016, 100=0.0064, 1000=0.0029, 2500=0.0025, 5000=0.0021 (USD)", Stock 1=328, Supplier 1=Digi-Key, Termination=SMD/SMT, Voltage Rating (DC)=50V, Weight=2.3E-05oz, Width=0.5mm, Working Voltage=50V